# Altium PCB STM32H743I-EVAL2PCBDESIGN.PcbDoc (part 21 of 23)
Units mil, origin at the board's own origin, x right, y up, seen from the top; angles counter-clockwise.
Board outline 6558 x 5417 mil, 8 copper layers (L1_TOP, L2_GND, L3_HS1, L4_POWER, L5_SIG, L6_HS2, L7_GND, L8_BOTTOM), stack 61.368 mil thick; 620 components, 588 nets, 2945 pads, 1724 vias.
Unrouted connection lines stored in the file: 1.
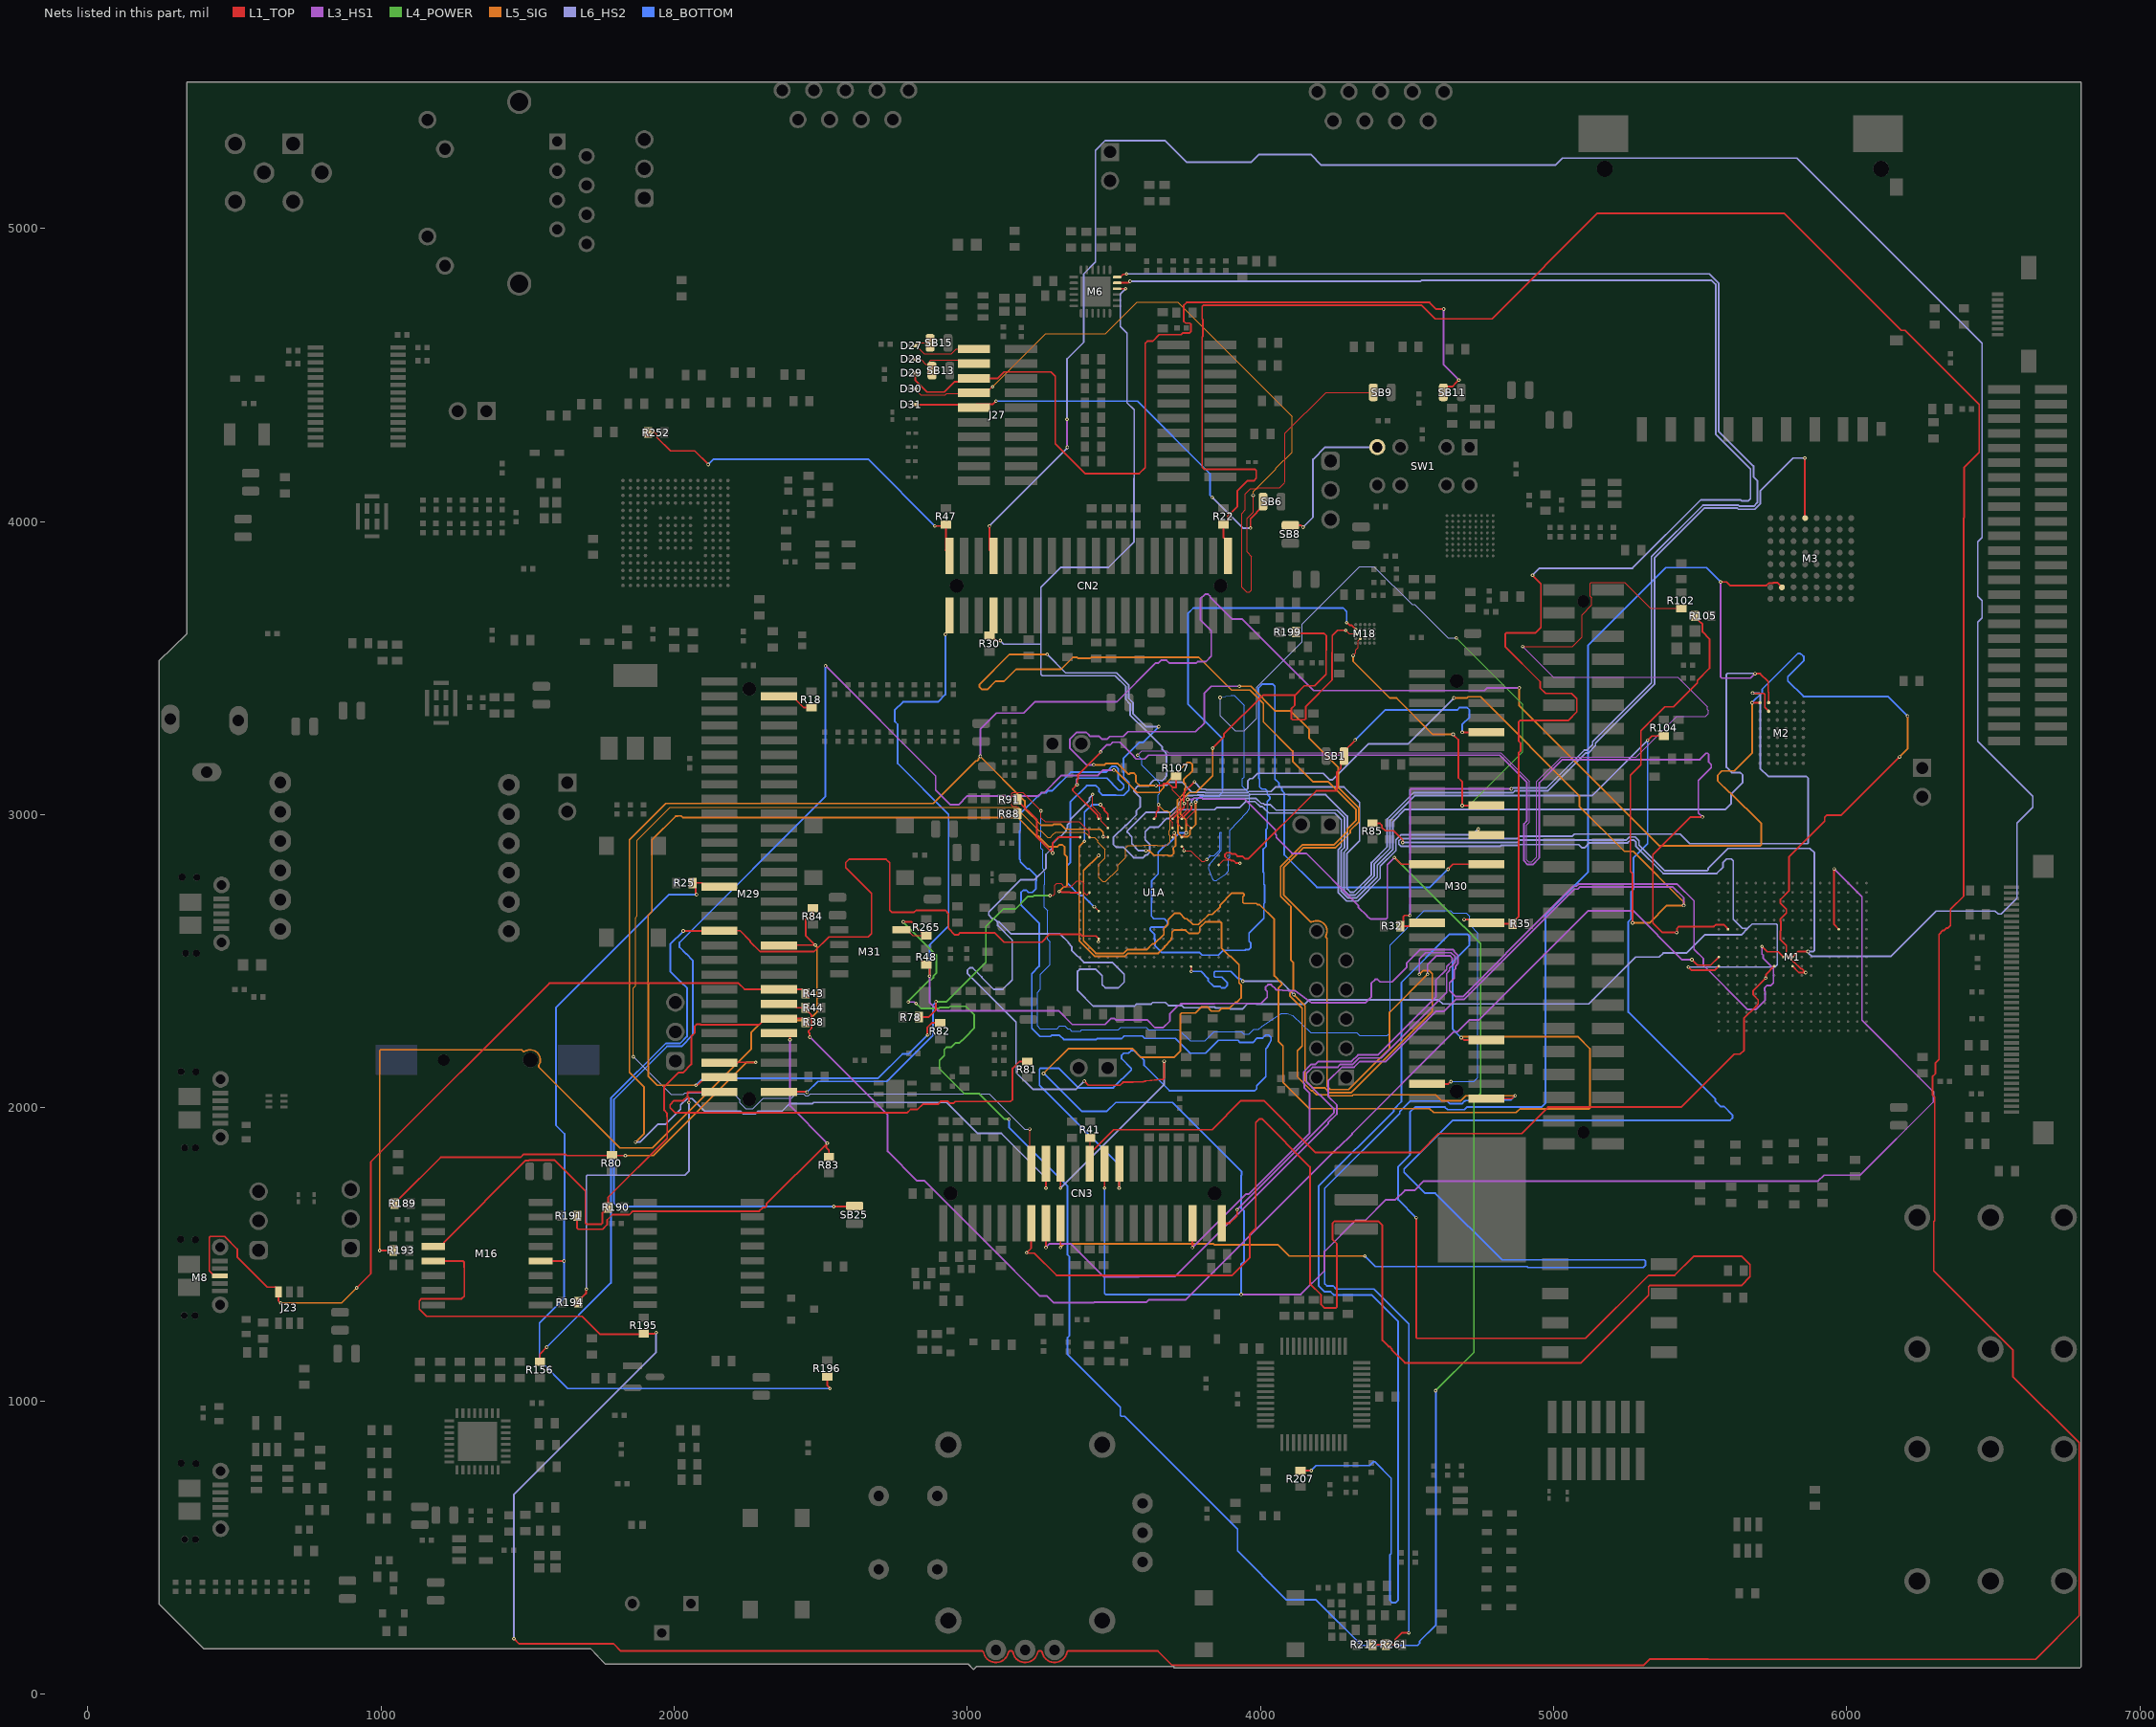
[diagram p18: the nets of this part, all layers, seen from the top]

## Via types
v1: diameter 12, hole 6, L1_TOP to L8_BOTTOM, tented both sides, 1724 vias

## Nets (pads, with @x,y where several pads share a name; then routed paths per layer and width w, separated by ;. In a path a pad name is that pad's centre, name@x,y a point inside that pad or via, vN(x,y) a via of type N, cw(c..) or ccw(c..) an arc to the next point about the centre after c; other vN are vias at no path point) (continued)
PC11: M18.B1 SB25.2 U1A.B13 | length 6565
  L1_TOP w4: U1A.B13@3763,2954.48 3748,2969.48 3748,2983.7 3779,3014.7 v1(3779,3043)
  L1_TOP w6: v1(2544,1663) 2613,1663 SB25.2@2615,1665 ; v1(4294,3655) 4295.62,3655 4304.77,3645.85 4311.9,3645.85 M18.B1@4325.01,3632.75
  L3_HS1 w6: v1(2516,3508) 2892,3132 2892,3084.33 2942.33,3034 2969.67,3034 2999.67,3064 3241.19,3064 3252.19,3075 3262.14,3075 3321.14,3134 3445.72,3134 3463.72,3152 v1(3500,3152)
  L5_SIG w6: v1(3500,3152) 3501.15,3150.85 3505.53,3150.85 3538,3118.38 3538,3117.33 3579.33,3076 3653.53,3076 3669.62,3092.09 3669.62,3098 3749.62,3178 3760.38,3178 3768,3170.38 3768,3149.19 3738,3119.19 3738,3111.87 3744,3105.87 3744,3090.13 3741.55,3087.68 3741.55,3075.07 3717,3050.53 3717,2994.26 3719,2992.26 3719,2936 3730.05,2924.95 3751.86,2924.95 3759.47,2932.57 3759.47,2946.71 3779,2966.24 v1(3779,3043)
  L8_BOTTOM w6: v1(2516,3508) 2516,3062 2018,2564 2018,2547.62 2040.31,2525.31 2040.69,2525.31 2063,2503 2063,2248 2024.5,2209.5 1975.28,2209.5 1794,2028.22 1794,1675.37 1806.37,1663 v1(2544,1663) ; v1(3779,3043) 3779,3044.62 3782,3047.62 3782,3049.38 3795.62,3063 3857.67,3063 3870,3075.33 3870,3259.86 3753.23,3376.63 3753.23,3687.37 3770.86,3705 4282.49,3705 4294,3693.49 v1(4294,3655)
PC12: M18.C1 M30.33 R199.2 U1A.C12 | length 4936.5
  L1_TOP w2: U1A.C12@3731.5,2922.98 v1(3746.47,2937.95) ; v1(4291,3629) 4303,3617 M18.C1@4325.01,3617
  L1_TOP w6: v1(3837,3227) 3874.88,3264.88 3874.88,3274.27 4008.17,3407.55 4117.17,3407.55 ; R199.2@4120.56,3623 4125.56,3618 4217.38,3618 4225,3610.38 4225,3599.62 4224.28,3598.9 4224.28,3561.52 4224.05,3561.29 4224.05,3479.66 4184.38,3440 4149.62,3440 4117.17,3407.55 ; v1(4291,3629) 4263.45,3629 4245,3610.55 4245,3553.95 4244.28,3553.24 4244.28,3459.14 4154.72,3369.57 4154.72,3337.88 4154.72,3327.88 4150.62,3323.78 4109.38,3323.78 4105.28,3327.88 4105.28,3361.77 4117.17,3373.66 4117.17,3407.55 ; v1(4640,2814) 4657,2831 M30.33@4770.99,2831
  L5_SIG w6: v1(3746.47,2937.95) 3746.47,2981.74 3727,3001.22 3727,3046.38 3756.44,3075.82 3780.56,3075.82 3837,3132.26 v1(3837,3227)
  L8_BOTTOM w6: v1(3746.47,2937.95) 3724.34,2937.95 3682.38,2896 3675.38,2896 3651,2871.62 3651,2797.38 3629,2775.38 3629,2699.73 3627.97,2698.7 3627.97,2653.81 3636.78,2645 3671.44,2645 3682.04,2634.4 3682.04,2623.63 3674.42,2616.02 3632.16,2616.02 3631.97,2616.2 3627,2616.2 3623.49,2612.69 3623.49,2606.88 3638.98,2591.38 3638.98,2575.54 3640,2574.53 3640,2553.62 3664,2529.62 3792.72,2529.62 3801.33,2521 3856.67,2521 3872.67,2537 3947.33,2537 3949.33,2539 3959.38,2539 3967,2546.62 3967,2561.62 3961,2567.62 3961,2595.39 4011.37,2645.76 4011.37,2695.99 4014,2698.62 4014,2759.7 4011.37,2762.33 4011.37,2802.01 4009,2804.38 4009,2881.69 4019,2891.69 4019,2949.47 4023,2953.47 4023,3044.67 4032.49,3054.16 4032.49,3059.13 4023,3068.62 4023,3080.31 4016.31,3087 4004.62,3087 3997,3094.62 3997,3112.51 3996.81,3112.7 3996.81,3121.18 3994.9,3123.09 3994.9,3411.57 3993,3413.47 3993,3432.53 4006.47,3446 4040.73,3446 4049.25,3437.49 4049.25,3121.56 4063,3107.81 4063,3098.57 4073,3088.57 4073,3082.27 4081,3074.27 4081,2863.16 4192.16,2752 4578,2752 v1(4640,2814)
PC13: M30.09 R207.2 U1A.E3 | length 7512.8
  L1_TOP w2: v1(3448,2861) v1(3448,2861) U1A.E3@3448.04,2859.99
  L1_TOP w6: R207.2@4136,761.56 4136.44,762 v1(4173,762) ; v1(4685,2239) 4686.62,2239 4694.62,2231 M30.09@4770.99,2231
  L5_SIG w6: v1(3448,2861) 3396,2809 3396,2569.19 3438.19,2527 3533.38,2527 3546.38,2540 3612.72,2540 3632.02,2559.3 3638.18,2559.3 3670.48,2591.61 3670.48,2612.07 3685,2626.59 3685,2641.38 3707.37,2663.75 3723.87,2663.75 3742.62,2645 3749.47,2645 3769.47,2625 3776,2625 3788.53,2625 3807.53,2644 3808.47,2644 3823.78,2659.3 3835.52,2659.3 3862.5,2686.28 3862.5,2691.88 3902.95,2732.33 3939.95,2732.33 3943.47,2728.82 3943.47,2723.85 3940,2720.38 3940,2701 3944,2697 3985.62,2697 3989.62,2693 3997,2693 4047,2643 4047,2449.96 4072.52,2424.44 4072.52,2419.47 4061,2407.95 4061,2227.33 4077,2211.33 4077,2086.14 4166.14,1997 4577.1,1997 4590.52,1983.57 4872.39,1983.57 4884.81,1996 5120.34,1996 5123.86,1999.51 5123.86,2201.57 5083.42,2242 4689.62,2242 4686.62,2239 v1(4685,2239)
  L8_BOTTOM w6: v1(4173,762) 4190,779 4372.14,779 4385,791.86 4389.97,791.86 4446,735.83 4446,478.62 4442,474.62 4442,318.62 4449.62,311 4460.38,311 4469.62,320.23 4469.62,1270.96 4379.07,1361.5 4249.93,1361.5 4239.43,1372 4218.33,1372 4199,1391.33 4199,1733.29 4455,1989.29 4455,1994.91 4481,2020.91 4481,2427.51 4645.49,2592 4705.38,2592 4713,2584.38 4713,2555 4656,2498 4656,2268 v1(4685,2239)
PC14: M30.04 R88.2 U1A.C2 | length 3888.7
  L1_TOP w4: R88.2@3170.56,3003 3170.56,3025.94 3168.22,3028.28 3155.29,3028.28 3151.78,3031.8 3151.78,3072.2 3155.29,3075.72 3188.28,3075.72 v1(3251,3013) 3251,2990 3265,2976 3382.3,2976 3416.54,2941.75 U1A.C2@3416.54,2922.98
  L1_TOP w6: M30.04@4568,2081 4640.38,2081 4648.38,2089 v1(4650,2089)
  L8_BOTTOM w4: v1(3251,3013) 3251,2885.09 3257,2879.09 3257,2816.87 3261,2812.87 3261,2807.01 3264,2804.01 3264,2762.11 3263,2761.11 3263,2683.97 3273.99,2672.99 3273.99,2574.04 3282,2566.03 3282,2488.04 3249,2455.04 3249,2404.11 3239,2394.11 3239,2279 3248,2270 3305.89,2270 3314.89,2279 3333.11,2279 3342.11,2270 3348.11,2270 3356.11,2262 3386.22,2262 3389.99,2265.76 3515.4,2265.76 3523.64,2274 3609.58,2274 3617.82,2265.76 3721.84,2265.76 3759.6,2228 3811.4,2228 3842.4,2259 3934.97,2259 3942.62,2251.34 3961.8,2251.34 3977.46,2267 3993.95,2267 4005.6,2277 4071.09,2322 4072.4,2322 4091.8,2322 4109.44,2314.45 4171.29,2257 4327.97,2257 4337.97,2247 4432,2247 4442,2257 4442,2443.67 4442,2544 4442,2554.73 4559.27,2672 4570,2672 4629.89,2672 4648.11,2672 4656.11,2664 4701.97,2664 4713,2652.97 4713,2625.4 4742,2596.4 4742,2102.34 4728.66,2089 v1(4650,2089)
PC15: R91.2 U1A.C1 | length 369.4
  L1_TOP w6: R91.2@3171.56,3052 3171.56,3048.06 3237.6,2982.03 3237.6,2922.4 v1(3291,2869) 3291,2904 3309.98,2922.98 U1A.C1@3385.05,2922.98
PD2: M18.D2 M30.41 U1A.D12 | length 4140.4
  L1_TOP w2: U1A.D12@3731.5,2891.49 3737.09,2885.91 3737.09,2878.91 v1(3739,2877) 3757.87,2877 3758.18,2877.3 3761.63,2877.3 3766.83,2872.1 3798.93,2840 3810,2840 v1(3817,2847) ; v1(4316,3543) 4325,3552 4325,3563 4333,3571 4333,3593.5 M18.D2@4340.76,3601.25
  L1_TOP w6: v1(4657,3274) 4675.13,3255.87 4675.13,3125.62 4688.13,3112.62 v1(4688.13,3031) M30.41@4770.99,3031
  L4_POWER w2: v1(4668.12,3603) 4894.85,3376.27 4894.85,3214.02 4711.83,3031 v1(4688.13,3031)
  L5_SIG w6: v1(4316,3543) 4316,3523.62 4441.38,3398.23 4464.19,3398.23 4588.43,3274 v1(4657,3274)
  L6_HS2 w2: v1(3862.5,3400) 3862.5,3336.94 3913.44,3286 3945,3286 3987,3328 3987,3435.01 4141.72,3589.73 4141.72,3650.28 4338.44,3847 4387,3847 4517,3717 4526.13,3717 4640.13,3603 v1(4668.12,3603)
  L8_BOTTOM w2: v1(3817,2847) 3829.66,2859.66 3841.22,2859.66 3862.11,2880.55 3862.11,2939.28 3863.28,2940.45 3864.94,2940.45 3866.11,2939.28 3866.11,2878.89 3824.42,2826.88 ccw(c3833,2820) 3822.73,2816.07 3835.73,2782.07 ccw(c3846,2786) 3852.35,2777.02 3880.61,2797 3891.12,2807.52 3891.12,2817.72 3891,2817.85 3891,2850.15 3895.78,2854.93 3895.78,2947.23 3954.01,3009.38 3962.01,3021.68 3962.01,3070.21 3955,3077.22 3955,3080.97 3938.81,3097.16 3938.81,3122.84 3944,3128.03 3944,3373.31 3909.8,3407.51 3898.2,3407.51 v1(3862.5,3400)
PD3: M30.34 M31.8 R265.1 U1A.B12 | length 8146.7
  L1_TOP w4: M31.8@2775.3,2607 2794,2607 2813.56,2587.44 2856.06,2587.44 R265.1@2860,2587.44 ; U1A.B12@3731.5,2954.48 3715.46,2970.52 3715.46,2982.46 3722.5,2989.5 3722.5,2989.7 3752,3019.2 3752,3051 v1(3751,3052)
  L1_TOP w6: v1(2781.32,2633.96) 2809.54,2633.96 R265.1@2856.06,2587.44 ; v1(4457,2854) 4480,2831 M30.34@4568,2831
  L3_HS1 w6: v1(2798.49,2361) 2818.38,2361 2823.38,2356 v1(2825,2356) ; v1(3751,3052) 3769.62,3052 3773.62,3056 3788.62,3056 3789.61,3057 3800.38,3057 3804.38,3053 3945.85,3053 4051,2947.85 4051,2933.1 4054,2930.1 4054,2921.61 4107.61,2868 4128.85,2868 4156.06,2868 4333.57,2690.49 4333.57,2684.17 4363.79,2653.94 4363.98,2653.76 4373.96,2645.4 4374.78,2644.89 4376.22,2644 4377.93,2644 4429.49,2644 4433,2647.51 4433,2830 v1(4457,2854)
  L4_POWER w6: v1(2781.32,2633.96) 2894,2521.29 2894,2459 2884,2449 2884,2443.62 2876.38,2436 2871,2436 2798.49,2363.49 2798.49,2358.51 v1@2799.14,2357.86 ; v1(2825,2356) 2842,2339 2902.53,2339 2905.53,2342 2937.67,2342 2941.67,2346 2994.73,2346 3023.51,2317.21 3023.51,2272.23 3008.91,2257.62 3008.91,2256.76 2981.33,2229.19 2980.24,2229.19 2972.76,2221.71 2959.71,2221.71 2944,2206 2928.62,2206 2921,2198.38 2921,2177.47 2905,2161.47 2905,2133.16 2990.51,2047.65 3040.73,2047.65 3127,1961.38 3141.62,1961.38 v1(3142,1961) ; v1(4457,2854) 4457,2853.62 4692.62,2618 4693.53,2618 4751,2560.53 4751,2049.22 4728,2026.22 4728,1165 v1(4597.76,1034.76)
  L8_BOTTOM w6: v1(3142,1961) 3142,1932.62 3341,1733.62 3341,1499.53 3348,1492.53 3348,1221.33 3341,1214.33 3341,1158.86 3522,977.86 3522,950.51 3525.51,947 3536.67,947 3922,561.67 3922,488 4089,321 4189.52,321 4345.52,165 4535.38,165 4543,172.62 4543,179.28 4598,234.28 4598,1034.53 v1(4597.76,1034.76)
PD4: CN3.28 M2.A2 M3.G2 U1A.A12 | length 13129.9
  L1_TOP w6: v1(3202,1505) 3203.15,1503.85 3228.43,1503.85 3304,1428.28 3903.24,1428.28 3963,1488.05 3963,1567.24 3983.82,1588.06 3983.82,1948.82 3997,1962 4005.28,1962 4168.95,1798.33 4168.95,1399 4206.72,1361.24 4206.72,1328.45 4217.94,1317.22 4257.49,1317.22 4261,1320.74 4261,1535.6 4245.43,1551.17 4245.43,1605.53 4252.38,1612.49 4401.68,1612.49 4416.03,1598.14 4416.03,1206.35 4437.38,1185 4440.38,1185 4448,1177.38 4448,1174.38 4492.9,1129.49 5093.81,1129.49 5323.96,1359.64 5323.96,1388.98 5328.06,1393.08 5640.03,1393.08 5670.34,1423.38 5670.34,1464.62 5641.88,1493.08 5477.98,1493.08 5412.86,1427.96 5323.96,1427.96 5109,1213 4534.51,1213 4531,1216.51 v1(4531,1625) ; v1@3203.43,1506.43 3218,1521 CN3.28@3218,1606 ; U1A.A12@3731.5,2985.98 3764,3018.47 v1(3764,3036) ; v1(5570,3794) 5589.69,3794 5601.69,3782 5726.31,3782 5734.09,3789.78 5748.46,3789.78 5750.68,3792 5763.04,3792 M3.G2@5779.26,3775.78 ; v1(5687,3481) 5705,3481 5732,3454 5732,3419.62 5733.89,3417.73 5733.89,3382.83 M2.A2@5733.53,3382.47
  L3_HS1 w6: v1(5570,3794) 5570,3469.51 5573.51,3466 5672,3466 v1(5687,3481)
  L6_HS2 w6: v1(3764,3036) 3765.15,3037.15 3765.15,3047.53 3773.62,3056 3788.62,3056 3789.62,3057 3800.38,3057 3802.38,3055 3985.62,3055 4002.62,3038 4010.14,3038 4014.14,3034 4034.62,3034 4053.28,3015.33 4261.29,3015.33 4286.22,2990.41 4286.22,2887.25 4275,2876.03 4275,2738.81 4298.43,2715.38 4326.81,2715.38 4398.38,2786.95 4398.38,2827.91 4452,2881.53 4452,2976.38 4493.62,3018 5586.49,3018 5606,3037.51 5606,3070.47 5645,3109.47 5645,3135.38 5636.38,3144 5607.38,3144 5589.62,3161.77 5589.62,3478.49 5593.13,3482 5686,3482 v1(5687,3481)
  L8_BOTTOM w6: v1(4531,1625) 4470,1686 4470,1798.81 4510,1838.81 4510,1984.72 4527.51,2002.24 4629.34,2002.24 4638,1993.57 4695.35,1993.57 4704.02,2002.24 4958.48,2002.24 4972.62,2016.38 4972.62,2659.62 5118,2805 5118,3577.86 5383.14,3843 5521,3843 v1(5570,3794)
PD5: CN3.26 R105.1 U1A.A11 | length 6743.6
  L1_TOP w6: v1(3268,1523) CN3.26@3268,1606 ; U1A.A11@3700.01,2985.98 3738.85,3024.82 3738.85,3036.85 v1(3740,3038) 3738.85,3039.15 3738.85,3045.76 3738,3046.62 3738,3075 v1(3775,3112) ; v1(5269.12,2630.79) 5269.12,2799.26 5262,2806.38 5262,3134 5298,3170 5298,3286.48 5379.29,3367.77 5409.25,3367.77 5490.54,3449.05 5490.54,3457.95 5532,3499.41 5532,3600 5508.09,3623.91 5508.09,3649.99 5503.27,3654.81 5502.19,3654.81 5482.93,3674.08 R105.1@5482.93,3678.02
  L3_HS1 w6: v1(3268,1523) 3281,1536 3352.86,1536 3466.86,1422 3583.44,1422 3586.44,1425 3709.86,1425 3923.86,1639 3925.38,1639 4231,1944.62 4231,1948.86 4260.57,1978.43 4260.57,2009.31 4231,2038.88 4231,2091.5 4277.5,2138 4318.92,2138 4338.92,2158 4427.47,2158 4598.75,2329.28 4626.92,2329.28 4667.64,2370 4695.81,2370 4847.64,2521.83 4847.64,2522.88 5070.76,2746 5082.29,2746 5089.29,2753 5407,2753 5444,2716 v1(5444,2690)
  L5_SIG w6: v1(4660,3398) 4704,3398 4708,3402 4750.38,3402 5088,3064.38 5088,3028.62 5241.67,2874.94 5271.67,2874.94 5444,2702.62 v1(5444,2690) 5386.17,2690 5326.95,2630.79 v1(5269.12,2630.79)
  L6_HS2 w6: v1(3775,3112) 3786.54,3100.46 3786.54,3098.08 3797.62,3087 3812.81,3087 3814.81,3085 3952.49,3085 3956.81,3089.32 3956.81,3115.38 3964.42,3123 3973,3123 3991,3141 4213.8,3141 4235.62,3119.19 4246.38,3119.19 4369.2,3242 4504,3242 v1(4660,3398)
PD6: CN3.06 M3.A4 R107.2 U1A.B11 | length 9354.4
  L1_TOP w4: U1A.B11@3700.01,2954.48 3700.01,2973.25 3691.01,2982.25 3691.01,2989.7 3728,3026.7 3728,3055.73 3700.01,3083.72 3700.01,3093
  L1_TOP w6: v1(3644,3099) 3662.82,3099 3669.82,3106 3687.01,3106 3700.01,3093 3712,3093 R107.2@3712,3131.44 ; v1(3768,1523) CN3.06@3768,1606 ; v1(5857,4217) 5857.5,4216.5 5857.5,4012.5 M3.A4@5857.87,4012.13
  L3_HS1 w6: v1(3431,3170) 3405.84,3170 3350,3225.84 3350,3258.16 3372.84,3281 3405.16,3281 3415.16,3271 3418.16,3268 3448.47,3268 3458.47,3258 3477.53,3258 3486.53,3267 3531.53,3267 3547.53,3283 3778.53,3283 3808.57,3313.04 3808.57,3414.95 3831.62,3438 v1(3928,3438) ; v1(3768,1523) 3950,1705 3958.86,1705 4168,1914.14 4168,2049 4150,2067 4150,2081.36 4147,2084.36 4147,2121.64 4173.36,2148 4187.5,2148 4197.5,2158 4310.64,2158 4332.64,2180 4400.53,2180 4598,2377.47 4598,2435.14 4635,2472.14 4635,2481.44 4654,2500.44 4654,2511.21 4646.38,2518.83 4601.3,2518.83 4570,2487.53 v1(4570,2455)
  L5_SIG w6: v1(3431,3170) 3468.58,3170 3473.58,3175 3512.33,3175 3548.49,3138.84 3553.46,3138.84 3556.62,3142 3567.38,3142 3575,3134.38 3575,3112.33 3588.33,3099 v1(3644,3099) ; v1(3928,3438) 3967.27,3438 4051.27,3354 4103.38,3354 4166,3291.38 4166,3260.62 4266,3160.62 4266,3091.54 4336,3021.54 4336,2976.31 4306.22,2946.53 4306.22,2937.75 4255.79,2887.33 4147.33,2887.33 4079,2819 4079,2726.36 4171.52,2633.84 4174.01,2633.84 ; 4174.04,2633.84 4180.64,2636.11 cw(c4192,2603) 4222.84,2586.45 4222.84,2585.01 4222.84,2582.52 4227,2578.36 4227,2073.62 4238.62,2062 4300.5,2062 4440.68,2202.18 4440.68,2325.68 v1(4570,2455)
  L6_HS2 w6: v1(3644,3099) 3645,3100 3679.81,3100 3690.81,3111 3731.62,3111 3765.62,3077 3808.67,3077 3810.67,3075 3956.63,3075 3960.63,3079 4036.34,3079 4051.34,3094 4285,3094 4338,3041 4338,2910.74 4295,2867.74 4295,2747.1 4306.72,2735.38 4318.53,2735.38 4378.38,2795.24 4378.38,2814.38 4378.38,2836.2 4432,2889.81 4432,2984.67 4522.33,3075 4861.38,3075 4867.38,3081 4979.62,3081 5108.62,3210 5117.81,3210 5143,3235.19 5143,3244.38 5344,3445.38 5344,3876.14 5513.86,4046 5626.95,4046 5630.61,4042.35 5686.87,4042.35 5705,4060.47 5705,4104.3 5817.7,4217 v1(5857,4217)
PD7: CN3.24 R104.1 U1A.C11 | length 8561.5
  L1_TOP w2: U1A.C11@3700.01,2922.98 3701.12,2924.1 3701.12,2930.41 3706,2935.29 v1(3706,2938)
  L1_TOP w6: v1(3318,1523) CN3.24@3318,1606 ; v1(5321,3254) 5335.46,3268.46 R104.1@5376.49,3268.46
  L5_SIG w6: v1(3318,1523) 3331,1536 3839.19,1536 3843.19,1532 4060.38,1532 4098.38,1494 v1(4356,1494) ; v1(3609,2877) 3621.62,2877 3636.62,2862 3683.62,2862 3685.62,2860 3696.38,2860 3704,2867.62 3704,2878.38 3702.38,2880 3702.38,2886 3710,2893.62 3710,2929.76 3709,2930.76 3709,2933.38 3706,2936.38 v1(3706,2938)
  L6_HS2 w6: v1(3609,2877) 3584.62,2877 3561.01,2900.6 3561.01,2924.37 3545.76,2939.63 3545.76,2944.6 3609.52,3008.36 3694.75,3008.36 3720.18,3033.8 3720.18,3039.57 3745.62,3065 3768.47,3065 3769.47,3066 3784.47,3066 3785.47,3067 3804.53,3067 3806.53,3065 3960.77,3065 3964.77,3069 4093.27,3069 4094.27,3068 4222.77,3068 4296.22,2994.55 4296.22,2883.1 4285,2871.89 4285,2742.95 4302.57,2725.38 4322.67,2725.38 4388.38,2791.1 4388.38,2810.24 4388.38,2832.05 4442,2885.67 4442,2980.53 4526.47,3065 5132,3065 v1(5321,3254)
  L8_BOTTOM w6: v1(4356,1494) 4392,1458 4910.04,1458 4913.04,1455 5306.38,1455 5314,1462.62 5314,1475.68 5308.68,1481 4823.86,1481 4596.36,1708.5 4561.5,1708.5 4490,1780 4490,1790.53 4656.47,1957 5602.38,1957 5610,1964.62 5610,1975.38 5581.07,2004.31 5569.3,2004.31 5552,2021.62 5552,2029.14 5255,2326.14 5255,2635.05 5264,2644.05 5264,2737 5272.12,2745.12 5272.12,2851.59 5321,2900.47 v1(5321,3254)
PDM_CLK1: SB8.2 SW1.4 | length 527.5
  L1_TOP w6: SB8.2@4102,3987 4139,3987 v1(4145,3981)
  L6_HS2 w6: v1(4145,3981) 4179.21,4015.21 4179.21,4212.29 4220.88,4253.96 SW1.4@4398.52,4253.96
PE0: CN3.25 M1.K9 M2.A1 U1A.C4 | length 10879.2
  L1_TOP w2: v1(3463,2925) 3464.01,2923.99 3478.53,2923.99 U1A.C4@3479.54,2922.98
  L1_TOP w6: v1(3268,1725.99) CN3.25@3268,1808.99 ; v1(5677,3382) 5677.06,3382.06 5704.31,3382.06 M2.A1@5704.36,3382.11 ; M1.K9@5815.49,2483.02 5837.51,2461 v1(5860,2461) 5846.41,2474.59 5842.91,2474.59 5821.05,2496.45 5819.41,2496.45 5793.99,2521.87 5793.99,2553.87 5774.24,2573.62 5774.24,2604.11 5775,2604.87 5775,2635.35 5773.99,2636.36 5773.99,2644.65 5793.99,2664.65 5793.99,2677.75 5773.99,2697.75 5773.99,2710.85 5802.97,2739.83 5802.97,2855.97 5924.52,2977.52 5924.52,2990.9 5932.13,2998.52 5981.52,2998.52 v1(6180,3197)
  L3_HS1 w6: v1(3044,3199) 3044,3291.27 3099.73,3347 3192,3347 3230,3385 3509.62,3385 3641.62,3517 3650.47,3517 3660.47,3527 3679.53,3527 3689.53,3517 3780.47,3517 3785.47,3522 3813.38,3522 3832,3540.62 3832,3628 3795,3665 3795,3736.38 3810.62,3752 3821.38,3752 3829,3744.38 3829,3741.25 3903.25,3667 3938.43,3667 4181.85,3423.57 4764.1,3423.57 4773.35,3432.82 v1(4883,3432.82)
  L5_SIG w6: v1(1868,1883) 1897,1912 1897,2070.23 1847,2120.23 1847,2914 1971,3038 2883,3038 3028.64,3183.64 3033.9,3183.64 3037.42,3187.16 3037.42,3190.79 3044,3197.38 v1(3044,3199) 3196,3047 3196,3019.72 3251.72,2964 3290.76,2964 3293.76,2967 3319.38,2967 3336.38,2950 3453.15,2950 3463,2940.15 v1(3463,2925) ; v1(4883,3432.82) 4883,3371 5360,2894 5705.49,2894 5709,2897.51 5709,2969 5602,3076 5599.47,3076 5560,3115.47 5560,3134.53 5574.47,3149 5616.53,3149 5677,3209.47 v1(5677,3382) ; v1(6180,3197) 6207.56,3224.56 v1(6207.56,3336.44)
  L6_HS2 w6: v1(1868,1883) 1883.62,1883 1944.62,1944 1970.53,1944 2022,1995.47 2022,2009.62 2035.38,2023 2036.62,2023 2044.62,2031 2061,2031 2103.43,1988.57 2225.11,1988.57 2235.11,1978.57 2276.89,1978.57 2286.89,1988.57 2368.58,1988.57 2394.01,2014 2471.62,2014 2475.62,2018 2929,2018 3034.81,1912.19 3116.19,1912.19 3268,1760.38 v1(3268,1725.99)
  L8_BOTTOM w6: v1(5677,3382) 5711.81,3416.81 5711.81,3428.34 5833.47,3550 5841,3550 5843.59,3547.41 5845.64,3547.41 5853.26,3539.79 5853.26,3525.33 5799,3471.07 5799,3456.62 5852.24,3403.37 6140.63,3403.37 v1(6207.56,3336.44)
PE1: CN3.23 M1.K1 M2.B2 U1A.B4 | length 10542
  L1_TOP w4: v1(3427,3069) 3427,3027.85 3453.54,3001.3 3453.54,2993.2 3457.04,2989.7 3457.04,2982.25 3456.06,2981.27 3456.06,2977.96 U1A.B4@3479.54,2954.48
  L1_TOP w6: v1(3318,1725.99) CN3.23@3318,1808.99 ; v1(3399,2091) 3413,2077 3521.03,2077 3531.03,2087 3566.14,2087 3579.02,2088.27 ; 3579.05,2088.27 cw(c3579.61,2082.3) 3581.47,2088 3600.53,2088 3602.53,2090 3603.8,2090 ccw(c3603.8,2096) 3605.52,2090.25 3608.13,2091.03 cw(c3609.85,2085.28) 3609.26,2091.25 3667.49,2097 3669.08,2098.59 3669.24,2098.75 3671,2100.51 v1(3671,2158.67) ; v1(5460,2480) 5471,2469 5549.5,2469 M1.K1@5563.52,2483.02 ; v1(5679,3415) 5680.15,3413.85 5717.13,3413.85 5720.64,3410.34 5720.64,3365.83 M2.B2@5733.89,3352.58
  L6_HS2 w6: 3102.76,2635 3107.14,2635 3149.14,2593 3316.05,2593 3345,2564.05 3345,2561.38 3356,2550.38 3356,2537.29 3397.29,2496 3494.72,2496 3535,2455.72 3535,2428.62 3515.38,2409 3470.62,2409 3460,2419.62 3460,2450.38 3438.24,2472.14 3382.62,2472.14 3376,2465.53 3376,2400.33 3429.33,2347 3570.14,2347 3576.14,2353 3626.05,2353 3632.05,2359 3675.95,2359 3685.95,2349 3731.28,2349 3739.28,2341 3796.47,2341 3799.47,2344 3843.07,2344 3847.07,2340 3893.53,2340 3896.53,2337 3938.33,2337 3956.33,2355 3985.53,2355 3987.53,2353 4150.08,2353 4165.08,2368 4607.55,2368 4621.55,2354 5120.14,2354 5280.14,2514 5360.33,2514 5374.33,2528 5453.62,2528 5515.62,2590 5640.47,2590 5662.47,2612 ; v1(3318,1725.99) 3671,2078.99 v1(3671,2158.67) ; v1(3399,2091) 3371,2063 3223,2063 3166,2120 3166,2292.62 3000,2458.62 3000,2469.38 3007.62,2477 3018.38,2477 3049.43,2445.96 3049.43,2444.04 3089.47,2404 3120.67,2404 3153,2436.33 3153,2572.17 3103.63,2621.54 3103.63,2632.76 3102.07,2634.31 3090.88,2645.5 3085.12,2645.5 3073,2657.62 3073,2668.38 3182.62,2778 3229.95,2778 3268,2816.05 3268,2864.38 3290,2886.39 3290,2900.33 3314.51,2924.85 3317.37,2924.85 3337,2944.47 3337,2951.43 3342,2956.43 3342,2966.57 3352,2976.57 3352,2984.43 3417.06,3049.49 3417.06,3057.73 3427,3067.67 v1(3427,3069) ; v1(5460,2480) 5754.49,2480 5763,2488.51 5763,2623.49 5759.49,2627 5677.47,2627 5662.47,2612 ; v1(5679,3415) 5701.49,3415 5705,3411.49 5705,3158 5732,3131 5861.99,3131 5869,3123.99 5869,2904.67 5865.49,2901.15 5464.56,2901.15 5432.01,2933.7 5070.62,2933.7 5062.91,2926 4882.6,2926 4874.6,2918 4479.62,2918 4472,2910.38 4472,2899.62 4479.62,2892 4817.86,2892 4820.86,2895 4879.89,2895 4882.59,2897.7 5085.47,2897.7 5095.47,2887.7 5106.24,2887.7 5122.24,2903.7 5252.8,2903.7 5262.8,2913.7 5273.57,2913.7 5281.18,2906.09 5281.18,2891.94 5374.12,2799 5556.38,2799 5578,2820.62 5578,2836.89 5590.11,2849 5606.38,2849 5613,2842.38 5613,2642.62 5643.62,2612 5662.47,2612
PE2: D31.1 J27.12 SB6.2 | length 1487.7
  L1_TOP w6: D31.1@2821.61,4399 3012.88,4399 J27.12@3022.88,4389 3034.45,4400.57 3087.57,4400.57 v1(3098,4411) ; v1(3966,3978) 3966,4010 4009,4053 SB6.2@4009,4068
  L6_HS2 w6: v1(3835,4083) 3940,3978 v1(3966,3978)
  L8_BOTTOM w6: v1(3098,4411) 3580.27,4411 3828,4163.27 3828,4090 v1(3835,4083)
PE3: D30.1 J27.14 SB9.2 | length 3293.2
  L1_TOP w4: D30.1@2821.61,4453 2841.61,4433 2925.18,4433 2929.18,4437 J27.14@3020.88,4437 ; J27.14@3022.88,4439 3063.24,4439 3084.24,4460 v1(3086,4460) ; v1(3975,4090) 3975,4031.73 3954,4010.73 3954,3896.38 3970,3880.38 3970,3766.03 3962.97,3759 3953.03,3759 3936,3776.03 3936,4027.98 3948.31,4040.29 3948.31,4094.42 3965.89,4112 3989.77,4112 3992.77,4115 4065.87,4115 4082,4131.13 4082,4132.54 4084,4134.54 4084,4301 4224,4441 SB9.2@4385,4441
  L5_SIG w4: v1(3086,4460) 3268,4642 3472,4642 3579,4749 3717.09,4749 4108,4358.09 4108,4237 4053,4182 4053,4179.89 3975.11,4102 3975.11,4090.11 v1(3975,4090)
PE4: D29.1 J27.16 SB11.2 | length 3086.5
  L1_TOP w6: D29.1@2822.61,4507 2822.61,4481.39 2862,4442 2921.46,4442 2956.89,4477.43 3011.31,4477.43 J27.16@3022.88,4489 3103.73,4489 3125.3,4510.57 3285.82,4510.57 3300,4496.38 3300,4265.05 3401.05,4164 3586.49,4164 3606.88,4184.4 3606.88,4608.38 3614.5,4616 3632.76,4616 3654.76,4638 3729,4638 3734.4,4643.4 3757.65,4643.4 3763.05,4648.8 3763.05,4673.2 3758.95,4677.3 3744.81,4677.3 3737.78,4684.33 3737.78,4737.76 3748.02,4748 4577,4748 4600,4725 v1(4625,4725) ; SB11.2@4624,4441 4624,4448.84 4635.66,4460.5 4654.5,4460.5 4663,4469 4663,4469.51 4676.49,4483 v1(4677,4483)
  L3_HS1 w6: v1(4625,4725) 4625,4535 v1(4677,4483)
PE5: D28.1 J27.18 SB13.2 | length 271.5
  L1_TOP w4: D28.1@2822.61,4554 2840.5,4554 2858,4536.5 2866.42,4536.5 2879,4523.92 SB13.2@2879,4515 2872,4522 2872,4547.9 2876.1,4552 2969.53,4552 2982.53,4539 J27.18@3022.88,4539
PE6: D27.1 J27.20 SB15.2 | length 270.2
  L1_TOP w4: D27.1@2822.61,4600 D27.1@2825.07,4600 ; SB15.2@2873,4610 2835.07,4610 D27.1@2825.07,4600 ; J27.20@3022.88,4589 2962,4589 2955,4582 2955,4581.91 2946.09,4573 2852.07,4573 D27.1@2825.07,4600
PF6: M29.08 R80.2 R189.1 | length 1560.3
  L1_TOP w6: R189.1@1045.44,1673 1045.44,1676.94 1056.22,1687.72 1060.16,1687.72 1203.56,1831.12 1476.33,1831.12 1486.21,1841 1629.14,1841 1633.14,1837 v1(1833,1837) ; M29.08@2155.5,2155 v1(2278.01,2155)
  L5_SIG w6: v1(1833,1837) 1929,1837 2245.85,2153.85 2276.86,2153.85 v1(2278.01,2155)
PF7: M29.04 R81.2 R194.2 | length 2626.6
  L1_TOP w6: R194.2@1672.56,1336 1672.56,1339.94 1698.85,1366.23 1698.85,1379.85 v1(1700,1381) ; v1(2050,2018) 2050,2034.02 2046.5,2037.53 ; M29.04@2153.5,2053 2047.85,2053 2045.14,2053 2045.14,2038.88 2046.5,2037.53 ; R81.2@3204,2157.56 3177.28,2157.56 3154.01,2134.29 3154.01,2027.87 3147.15,2021 3135.62,2021 2958.47,2021 2952.47,2015 2940.62,2015 2933.62,2022 2909.47,2022 2899.47,2012 2847.6,2012 2829.93,1994.33 2806.19,1994.33 2794.86,1983 2002.61,1983 1986,1999.62 1986,2010.38 1999.57,2023.95 2030.22,2023.95 2043.79,2037.53 2046.5,2037.53
  L6_HS2 w6: v1(1700,1381) 1700,1766.49 1703.51,1770 2036.49,1770 2050,1783.51 v1(2050,2018)
PF8: M29.11 R83.2 R191.2 | length 1543
  L1_TOP w6: R191.2@1668.56,1631 1668.56,1589.18 1672.07,1585.66 1755.52,1585.66 1771.12,1601.26 1771.12,1617.2 1789.2,1635.28 1846.7,1635.28 1858.23,1646.81 2289.81,1646.81 2302.19,1659.19 2309.77,1659.19 2314.43,1663.84 2314.43,1671.43 2516.24,1873.24 2521.19,1878.19 v1(2522,1879) 2522,1877.38 2518.36,1873.74 2518.36,1863.98 2528,1854.34 R83.2@2528,1831.56 ; M29.11@2358.5,2255 2383,2255 2395,2243 v1(2395,2232)
  L3_HS1 w6: v1(2395,2232) 2395,2006 v1(2522,1879)
PF9: M29.23 R84.2 R193.1 | length 3122.3
  L1_TOP w6: v1(995,1513) R193.1@1041.44,1513 ; M29.23@2358.5,2555 v1(2481,2555) 2448.28,2587.72 2448.28,2642.12 2456.11,2649.95 2465.17,2649.95 2473,2657.78 R84.2@2473,2680.56
  L5_SIG w6: v1(995,1513) 995,2194.08 998.51,2197.59 1479.41,2197.59 1485.24,2191.76 1487.73,2191.76 1495.41,2194.94 cw(c1508.69,2163) 1537.45,2143.78 1537.45,2142.04 1537.45,2139.55 1814,1863 1925.38,1863 2262,2199.62 2262,2256.14 2303.86,2298 2458.43,2298 2487,2326.57 2487,2548.49 2481,2554.49 v1(2481,2555)
PF10: M30.01 R212.2 R261.1 U1A.L3 | length 8060.4
  L1_TOP w2: v1(3433.07,2685.98) U1A.L3@3448.04,2671.02
  L1_TOP w6: R212.2@4382.56,168 R261.1@4428.44,168 4451.22,168 4459.05,175.83 4459.05,184.89 4482.16,208 v1(4506,208) ; M30.01@4770.99,2031 4857.79,2031 4867.79,2041 v1(4869,2041)
  L5_SIG w6: v1(3272,3547) 3143.97,3547 3040.72,3443.75 3040.72,3436.29 3049.99,3427.02 3068.1,3427.02 3096.44,3455.36 3125.37,3455.36 3166.19,3496.18 3318.81,3496.18 3359.63,3537 3373.88,3537 3376.88,3534 3419.12,3534 3422.12,3537 3789.53,3537 3901.53,3425 3964.43,3425 4010,3379.43 4010,3316.53 4110,3216.53 4110,3181.62 4178.62,3113 4230.4,3113 4326,3017.4 4326,2980.45 4296.22,2950.67 4296.22,2941.89 4251.65,2897.33 4143.18,2897.33 4069,2823.14 4069,2722.22 4094.44,2695.99 4104,2686.44 4104,2502.62 4112.52,2494.1 4112.52,2402.9 4101,2391.38 4101,2380.62 4142,2339.62 4142,2210.38 4126,2194.38 4126,2105.36 4173.36,2058 4177,2058 4191,2044 4228.33,2044 4231.33,2041 4313.14,2041 4316.14,2044 4598,2044 4618.43,2023.57 4682.93,2023.57 4700.35,2041 v1(4869,2041)
  L6_HS2 w6: v1(3272,3547) 3335,3484 3508.83,3484 3550.76,3442.07 3550.76,3396.51 3565,3382.27 3565,3344.62 3609.62,3300 v1(3653,3300)
  L8_BOTTOM w6: v1(3433.07,2685.98) 3432.04,2685.98 3393.53,2724.5 3382.36,2724.5 3340,2766.86 3340,2825.5 3351,2836.5 3351,3042.81 3407.32,3099.13 3438.25,3099.13 3449.44,3087.95 3449.44,3078.18 3460.62,3067 3506.16,3067 3507.36,3065.8 3533.04,3065.8 3551.2,3083.96 3551.2,3109.64 3533.2,3127.64 3533.2,3142.3 3533,3142.5 3533,3193.38 3585.73,3246.12 3599.12,3246.12 v1(3653,3300) ; v1(4506,208) 4506,1262.86 4387.36,1381.5 4258.22,1381.5 4247.72,1392 4226.62,1392 4219,1399.62 4219,1725.01 4475,1981.01 4475,1986.63 4511.37,2023 4636.86,2023 4646.28,2013.57 4687.07,2013.57 4695.99,2022.5 cw(c4700.23,2018.25) 4699.42,2024.19 cw(c4700.27,2018.25) 4700.05,2024.25 ; 4700.1,2024.25 4778.19,2026 4778.29,2026 4778.36,2026 4854,2026 v1(4869,2041)
PF11: CN2.08 M1.J9 R85.2 | length 9776.9
  L1_TOP w6: 3075,3901.5 v1(3075,3984.5) ; R85.2@4382,2970.56 4407.44,2970.56 4413.91,2964.09 4413.91,2957.25 4425.98,2945.19 4453.65,2945.19 4485,2913.84 v1(4485,2905) ; M1.J9@5815.49,2514.52 5833.97,2533 v1(5868,2533)
  L3_HS1 w6: v1(3340,4349) 3340,4254.75 v1(3341,4253.75)
  L6_HS2 w6: v1(3075,3984.5) 3341,4250.5 v1@3341,4257 ; v1(3340,4349) 3340,4555.47 3397,4612.47 3397,4845.47 3437,4885.47 3437,5266.7 3470.51,5300.22 3673.94,5300.22 3748.15,5226 3968.14,5226 3995.14,5253 4170.94,5253 4207.44,5216.5 5006.4,5216.5 5030.46,5240.56 5829.42,5240.56 6462,4607.98 6462,3945.62 6447,3930.62 6447,3745.62 6462,3730.62 6462,3671.38 6447,3656.38 6447,3250.62 6635,3062.62 6635,3024.95 6581.19,2971.14 6581.19,2714.75 6527.38,2660.94 6516.62,2660.94 6506.62,2670.94 6304.94,2670.94 6151,2517 5880.37,2517 5871,2526.37 5871,2528.38 5868,2531.38 v1(5868,2533) 5886.49,2533 5890,2536.51 5890,2869.53 5874.53,2885 5594.62,2885 5527.5,2817.88 5527.5,2812.51 5523.99,2809 5378.27,2809 5291.18,2896.09 5291.18,2910.23 5277.71,2923.7 5258.65,2923.7 5248.65,2913.7 4884.45,2913.7 4875.74,2905 v1(4485,2905)
PG6: M29.57 R18.1 | length 186.6
  L1_TOP w6: M29.57@2298.98,3394 2356.5,3403 2406.02,3403 2416.01,3393 2416.01,3390.71 2441.28,3365.44 R18.1@2468,3365.44
PG7: M30.51 SB1.2 U1A.F16 | length 1400.3
  L1_TOP w4: U1A.F16@3857.49,2828.5 3874.49,2845.5 3888.34,2845.5
  L1_TOP w6: 3908,2843 3899.94,2843 3896.44,2846.5 3888.34,2846.5 3878.98,2855.85 3878.98,2864.13 3884.84,2869.99 3896.92,2869.99 3900.42,2866.5 3913.06,2866.5 3921.56,2857.99 3938.53,2857.99 3942.53,2854 3942.62,2854 3946.62,2850 3959.38,2850 4190.38,3081 4257.49,3081 4261,3084.51 4261,3145.33 4274.56,3158.89 4274.56,3174.56 4285,3185 4285,3216 4323,3254 v1(4323,3255) ; 3908.27,2843 3916.12,2835.15 3928.85,2835.15 v1(3930,2834) ; v1(4688.13,3281) M30.51@4770.99,3281
  L8_BOTTOM w6: v1(4323,3255) 4425,3357 4670.38,3357 4678.38,3365 4705.38,3365 4713,3357.38 4713,3332.44 4688.13,3307.57 v1(4688.13,3281)
PG8: CN2.40 M16.5 R22.1 R195.1 | length 16670
  L1_TOP w6: M16.5@1177.73,1477 1279.49,1477 1283,1473.49 1283,1455.63 1284,1454.63 1284,1357.56 1274.63,1348.19 1137.61,1348.19 1130.57,1341.16 1130.57,1312.84 1155.23,1288.19 1685.77,1288.19 1746.95,1227 1894,1227 R195.1@1896,1229 1932.38,1229 1936.38,1233 v1(1938,1233) ; v1(1453,188) 1470,171 1793,171 1818,146 3052.02,146 3053.77,144.24 3055.08,142.93 ccw(c3097.5,150) 3137.85,135.13 3141.2,144.21 ; 3141.23,144.24 3142.98,146 3152.02,146 3153.77,144.24 3155.08,142.93 ccw(c3197.5,150) 3237.85,135.13 3241.2,144.21 ; 3241.23,144.24 3242.98,146 3252.02,146 3253.77,144.24 3255.08,142.93 ccw(c3297.5,150) 3337.85,135.13 3341.2,144.21 ; 3341.23,144.24 3342.98,146 3650,146 3699,97 5306.14,97 5327.66,118.51 5527.49,118.51 5528,118 6644,118 6793.29,267.29 6793.29,856.66 6566.65,1083.31 6566.65,1174.31 6296.96,1443.99 6296.96,1611.96 6300,1615 6300,2036.54 6292.78,2043.75 6292.78,2106.34 6303.2,2116.76 6303.2,2153.06 6315,2164.86 6315,2591.53 6328.47,2605 6332.38,2605 6340.81,2613.43 6345.57,2613.43 6354,2621.86 6354,2676.86 6399,2721.86 6399,4013 6401,4015 6401,4185.08 6442.05,4226.12 6442.05,4226.91 6452.05,4236.91 6452.05,4400.34 6199.5,4652.89 6185.36,4652.89 5786.25,5052 5149.58,5052 4789.58,4692 4595.86,4692 4549.86,4738 3804.71,4738 3801.2,4734.49 3801.2,4691.62 3803.05,4689.77 3803.05,4632.23 3801.2,4630.38 3801.2,4185.53 3808.73,4178 3981.7,4178 3985.67,4174.03 3985.67,4147.62 3977.06,4139 3954.7,4139 3921.31,4105.6 3921.31,4051.47 3888.72,4018.88 3888.72,4001.22 3877.94,3990.44 R22.1@3874,3990.44 3874,3945.52 3889,3930.52 CN2.40@3889,3883
  L6_HS2 w6: v1(1453,188) 1453,680.38 1938,1165.38 v1(1938,1233)
PG9: M16.12 M29.32 R25.1 R196.2 | length 3188
  L1_TOP w6: M16.12@1544.27,1477 v1(1624,1477) ; v1(2076,2727) 2076,2728.62 2073.34,2731.28 2073.34,2756.22 R25.1@2062.56,2767 2093.98,2767 2106.98,2754 M29.32@2154.5,2754 ; R196.2@2522,1082.44 2522,1052.62 2531,1043.62 v1(2531,1042)
  L8_BOTTOM w6: v1(2076,2727) 1981.62,2727 1596.18,2341.57 1596.18,1940.45 1626,1910.63 1626,1634 1624,1632 v1(1624,1477) 1624,1349.19 1540,1265.19 1540,1139 1637,1042 v1(2531,1042)
PG10: CN3.27 R102.1 U1A.A9 | length 9091.6
  L1_TOP w4: v1(3213,1927) 3213,1813.99 CN3.27@3218,1808.99 ; v1(4895,3574) 5064.62,3574 5097.38,3606.76 5097.38,3682.15 5130.15,3714.91 5130.15,3740.03 5125.32,3744.86 5125.32,3788.83 5128.84,3792.34 5241.81,3792.34 5330.69,3703.46 R102.1@5435.49,3703.46
  L1_TOP w6: U1A.A9@3637.02,2985.98 3637.02,2986.75 3644.51,2994.25 3644.51,3008.49 3652,3015.98 v1(3652,3034)
  L3_HS1 w4: v1(3581,3203) 3595,3217 3680.03,3217 3685.03,3212 4819.68,3212 4918,3113.68 4918,2975.09 4908,2965.09 4908,2846.03 4915.03,2839 4924.97,2839 4942,2856.03 4942,3112.68 5026.32,3197 5280.97,3197 5419.97,3336 5518.97,3336 5528,3345.03 5528,3355.51 5525.34,3358.17 5525.34,3368.66 5424.27,3469.73 4999.27,3469.73 v1(4895,3574)
  L5_SIG w4: v1(1860,2174) 1860,2408.08 1868,2416.08 1868,2648 1874,2654 1874,2912.73 1986.27,3025 3174.66,3025 3177,3022.66 3177,3011.85 3243.85,2945 3251.03,2945 3273.03,2923 3282.97,2923 3291.48,2931.51 3300.97,2941 3399.14,2941 3408.63,2931.51 3417.26,2922.89 3433.61,2922.89 3445.07,2911.43 3445.07,2905.96 3470,2881.03 3470,2851.89 3449,2830.89 3449,2785.03 3462.03,2772 3471.97,2772 3513.74,2813.77 3513.74,2827.71 3539.56,2853.53 3539.56,2886.19 3547.36,2893.99 3597.8,2893.99 3599.82,2896 3646.46,2896 3648,2894.46 3658.51,2894.46 3659.06,2895 3679,2895 3691.72,2907.72 3691.72,2926.82 3688,2930.54 3688,2945.46 3691,2948.46 3691,3004.87 3681.7,3014.17 3669.83,3014.17 3652,3032 v1(3652,3034)
  L6_HS2 w4: v1(1860,2174) 1989,2045 2031.75,2045 2036.75,2050 2200.94,2050 2224.57,2026.37 2224.57,2015.98 2242.98,1997.57 2269.02,1997.57 2304.44,2033 2400.28,2033 2414.28,2047 2442.03,2047 2448.03,2041 2457.97,2041 2463.97,2047 3075,2047 3195,1927 v1(3213,1927)
  L8_BOTTOM w4: v1(3581,3203) 3595,3189 3595,3168.97 3656,3107.97 3656,3071.83 3651,3066.83 3651,3035 v1(3652,3034)
PG11: CN2.07 M6.16 M30.37 R30.1 | length 4718.5
  L1_TOP w6: R30.1@3076,3610.56 3079.94,3610.56 3097.64,3592.85 3110.85,3592.85 v1(3112,3594) ; M6.16@3510.84,4794.84 v1(3539.79,4794.84) ; v1(4743,2951) 4743,2942 4754,2931 M30.37@4770.99,2931
  L6_HS2 w6: v1(3112,3594) 3124,3582 3251.05,3582 ; v1(3539.79,4794.84) 3522,4777.06 3522,4666.22 3545,4643.22 3545,4405.33 3569,4381.33 3569,4147.95 3568,4146.95 3568,3930.14 3481.86,3844 3319.62,3844 3251.05,3775.43 3251.05,3582 ; v1(4743,2951) 4723,2931 4478.47,2931 4462,2914.53 4462,2877.38 4408.38,2823.77 4408.38,2782.81 4330.95,2705.38 4294.29,2705.38 4265,2734.67 4265,2880.17 4276.22,2891.39 4276.22,2982.49 4253.37,3005.33 4028.81,3005.33 4011.98,3022.17 4011.83,3022.17 4005.99,3028 3998.47,3028 3981.47,3045 3949.4,3045 3928.39,3023.99 3849.94,3023.99 3842.95,3017 3717.53,3017 3687.53,2987 3680.47,2987 3650.47,2957 3621.62,2957 3607,2942.38 3607,2914.5 3622,2899.5 3622,2871.62 3612.78,2862.39 3609.01,2862.39 3599.78,2853.17 3567.21,2853.17 3531.38,2888.99 3507.62,2888.99 3498,2898.62 3498,2922.39 3539.47,2963.86 3541,2963.86 3576.62,2999.47 3576.62,3013.09 3590,3026.47 3590,3057.53 3568.73,3078.8 3568.73,3083.77 3582.95,3098 3619,3098 3621.76,3100.76 3622.51,3101.51 3625.03,3106.27 3626.35,3108.22 3634.78,3116.65 3636.76,3118 3651.24,3118 3662.09,3116 3664.56,3116 3664.77,3116 3668.29,3119.52 3679.65,3133.23 3679.65,3200.44 3678,3209.13 3665,3222.13 3665,3231.1 3610.31,3285.78 3609.69,3285.78 3555,3340.47 3555,3378.13 3540.76,3392.37 3540.76,3437.93 3504.69,3474 3256.56,3474 3251.05,3479.51 3251.05,3582
PG12: M6.18 M30.26 R32.1 | length 5310.3
  L1_TOP w6: M6.18@3510.84,4834.21 3521.22,4834.21 3530.86,4843.85 3541.85,4843.85 v1(3543,4845) ; v1(4510,2656) 4491.62,2656 4487.34,2651.72 4487.34,2630.78 R32.1@4476.56,2620 4509.48,2620 4520.48,2631 M30.26@4568,2631
  L3_HS1 w6: v1(4510,2656) 4510,3084.49 4513.51,3088 v1(4856,3088)
  L6_HS2 w6: v1(3543,4845) 5531.86,4845 5563,4813.86 5563,4308.38 5682,4189.38 5682,4152.62 5695,4139.62 5695,4064.62 5682.73,4052.35 5634.75,4052.35 5631.1,4056 5509.72,4056 5334,3880.28 5334,3449.53 5133,3248.53 5133,3239.33 5113.67,3220 5104.47,3220 4975.47,3091 4860.62,3091 4857.62,3088 v1(4856,3088)
PG13: M6.17 M30.25 R35.1 | length 5512.4
  L1_TOP w6: M6.17@3510.84,4814.53 3547.9,4814.53 3553.38,4820 v1(3555,4820) ; v1(4695,2642) 4760,2642 4773.99,2628 R35.1@4860.44,2628 4860.44,2631.94 4881.22,2652.72 4881.22,3211.7 4886.85,3217.33 4886.85,3244.67 4881.22,3250.3 4881.22,3317.39 4884.74,3320.9 5049.16,3320.9 5079,3350.74 5079,3395.54 5060.67,3413.87 4972.61,3413.87 4954.27,3432.21 4954.27,3453.73 4834.9,3573.1 4834.9,3616.38 4838.41,3619.9 4937.86,3619.9 4957,3639.03 4957,3788 v1(4928,3817)
  L6_HS2 w6: v1(3555,4820) 4546.67,4820 4549.67,4823 5539.72,4823 5553,4809.72 5553,4298 5672,4179 5672,4078.38 5663.96,4070.35 5642.2,4070.35 5638.55,4074 5502.26,4074 5269.26,3841 4952,3841 v1(4928,3817)
PG14: M16.4 M29.13 R38.1 R190.1 | length 2072.9
  L1_TOP w6: M16.4@1177.73,1527 1206.08,1527 1214.89,1535.81 1214.89,1541.4 1493.49,1820 1503.69,1820 1504.69,1821 1592.38,1821 1697,1716.38 1697,1606.51 1700.51,1603 1751.65,1603 1755.17,1606.51 1755.17,1641.77 1758.68,1645.28 1763.66,1645.28 1774.44,1656.06 R190.1@1774.44,1660 ; R190.1@1774.44,1663.94 1774.44,1694.3 1976,1895.86 1976,1969.37 1975,1970.37 1975,1982.33 1966,1991.33 1966,2072.14 2013.36,2119.5 2029.58,2119.5 2058.08,2148 2058.08,2242.99 2070,2254.91 2070,2278.14 2076.86,2285 2088.09,2285 2090.09,2283 2288.98,2283 2309.98,2304 2436.66,2304 2447.44,2293.22 R38.1@2447.44,2292
PG15: CN3.19 M1.K7 R41.1 | length 2955.5
  L1_TOP w4: CN3.19@3419,1845.4 R41.1@3419,1897.44
  L1_TOP w6: CN3.19@3418,1808.99 3418,1844.4 3419,1845.4 3498.6,1925 3835,1925 3934,2024 4011.43,2024 4188.43,1847 4543.09,1847 4608.09,1912 4890.78,1912 4980.78,2002 5435.63,2002 5616.63,2183 5636.53,2183 5650,2196.47 5650,2215.53 5649.58,2215.95 5649.58,2305.19 5691,2346.61 5697.93,2353.55 5697.93,2368.19 5681.07,2385.04 5681.07,2399.68 5723.39,2442 v1(5724,2442) 5725.15,2443.15 5725.15,2455.68 5752.24,2482.77 M1.K7@5752.24,2483.01
PH0: M29.03 R78.2 U1A.J2 | length 1654.9
  L1_TOP w4: v1(3282,2724) 3283.53,2725.53 3293.53,2725.53 3298,2730 3298,2758.97 3305.03,2766 3318.72,2766 3329.72,2755 3353.28,2755 3372.8,2774.51 3388.77,2774.51 3397.23,2766.04 3397.23,2734.95 3405.7,2726.48 3409.02,2726.48 U1A.J2@3416.54,2734.01
  L1_TOP w6: M29.03@2358.5,2055 2449.38,2055 2451.38,2053 v1(2453,2053) ; R78.2@2834.56,2309 2867,2309 2893,2335 v1(2893,2362)
  L4_POWER w6: v1(2893,2362) 2929.38,2362 3063,2495.62 3063,2619.38 3121.81,2678.19 3163.58,2678.19 3206.38,2721 3224.62,2721 3227.62,2724 v1(3282,2724)
  L8_BOTTOM w6: v1(2453,2053) 2490,2090 2725.38,2090 2883,2247.62 2883,2350.79 2893,2360.79 v1(2893,2362)
PH1: M29.06 R82.2 U1A.J1 | length 3750.2
  L1_TOP w6: v1(2074,2077) 2075.15,2078.15 2081.13,2078.15 2105.98,2103 M29.06@2153.5,2103 ; v1(2864,2248) 2863.15,2248.85 2863.15,2272.15 2881,2290 2905.56,2290 R82.2@2907,2288.56 ; v1(3313,2738) 3314.15,2736.85 3320.99,2736.85 3322.85,2735 3350.45,2735 3351.44,2734.01 U1A.J1@3385.05,2734.01
  L5_SIG w6: v1(2074,2077) 1941.51,2077 1912,2106.51 1912,2424.12 1911,2425.12 1911,2656.38 1924,2669.38 1924,2914 2005,2995 2011.62,2995 2012.62,2996 2023.38,2996 2029.38,2990 3171.98,2990 3235.98,2926 3243.16,2926 3279.16,2890 3306.62,2890 3313.62,2897 3324.38,2897 3332,2889.38 3332,2864 3340,2856 3340,2758.62 3335.77,2754.38 3329.38,2754.38 v1(3313,2738)
  L8_BOTTOM w6: v1(2074,2077) 2097,2100 2695,2100 2778.43,2183.43 2799.43,2183.43 v1(2864,2248)
PH2: J23.3 M8.3 M29.17 R43.1 | length 3016.4
  L1_TOP w6: M8.3@449.61,1426 431.11,1426 420.66,1436.45 420.35,1436.45 414.09,1442.71 414.09,1557.41 417.61,1560.93 465.71,1560.93 509,1517.64 509,1490.86 611.86,1388 641.6,1388 649.6,1380 J23.3@649.6,1371.75 649.6,1341.4 v1(657,1334) ; v1(916.64,1385.45) 964.82,1433.63 964.82,1815.82 1574,2425 2218.92,2425 2239.92,2404 2436.66,2404 2447.44,2393.22 R43.1@2447.44,2390
  L5_SIG w6: v1(657,1334) 865.19,1334 v1(916.64,1385.45)
PH3: M1.J1 M29.15 R44.1 | length 4401.5
  L1_TOP w6: M29.15@2357.5,2354 2405.02,2354 2418.02,2341 R44.1@2447.44,2341 2447.44,2337.06 2468.22,2316.28 2468.22,2271.38 2458.85,2262.02 2458.85,2257.05 2461.85,2254.05 2461.85,2242.15 v1(2463,2241) ; v1(5472,2505) 5488.32,2488.68 ccw(c5493.62,2494.04) 5493.64,2486.5 5535.5,2486.5 M1.J1@5563.52,2514.52
  L3_HS1 w6: v1(2463,2241) 2728.14,1975.86 2728.14,1851.14 2828.58,1750.7 2853.58,1750.7 3161.38,1442.9 3161.38,1442.67 3246.05,1358 3271.05,1358 3294.05,1335 3431.1,1335 3432.1,1336 3610.57,1336 3619.57,1345 3745.33,1345 3816,1415.67 4264.33,1864 4266.14,1864 4313,1910.86 4313,1912.67 4659.61,2259.28 4672.75,2259.28 4713.47,2300 4746.38,2300 5118.38,2672 5271.38,2672 5438.38,2505 v1(5472,2505)
PH4: M29.26 R156.1 U1A.P3 | length 3874.7
  L1_TOP w6: R156.1@1542,1133.56 1542,1160 v1(1565,1183) ; v1(2031,2603) M29.26@2153.5,2603 ; M29.26@2154.5,2604 2225.02,2604 2259.05,2569.97 2259.05,2567.03 2293.08,2533 2477.39,2533 2527.39,2583 2662,2583 2672.88,2593.88 2672.88,2731.12 2585,2819 2585,2836.63 2596.37,2848 2722.63,2848 2735,2835.63 2735,2674.02 2742.02,2667 2818.5,2667 2824.84,2673.34 2925.66,2673.34 2931.28,2667.72 2931.28,2665.74 2936,2661.02 2936,2611.62 2957.62,2590 2968.38,2590 2975.38,2597 3093.18,2597 3125.18,2565 3253.62,2565 3280.62,2592 3386,2592 3392,2586 3438.52,2586 U1A.P3@3448.04,2576.53 ; v1(3447,2566) 3447.52,2566.52 3447.52,2576.01 U1A.P3@3448.04,2576.53
  L8_BOTTOM w6: v1(1565,1183) 1784,1402 1784,2032.37 1971.14,2219.5 2020.36,2219.5 2043.5,2242.64 2043.5,2397.11 2044,2397.62 2044,2408.38 2022.38,2430 2021.47,2430 1986.49,2464.99 1986.49,2558.49 v1(2031,2603)
PH5: CN2.02 R47.1 R252.1 | length 1260.8
  L1_TOP w6: R252.1@1910.44,4304 1933,4304 1940.94,4296.06 1940.94,4287.22 1987.05,4241.11 2069.89,4241.11 v1(2116,4195) ; v1(2889,3985) 2921.56,3985 R47.1@2927,3990.44 2927,3903.5 2925,3901.5
  L8_BOTTOM w6: v1(2116,4195) 2134,4213 2661,4213 v1(2889,3985)
PH6: CN2.01 M1.J8 R48.1 | length 5723.4
  L1_TOP w6: R48.1@2860,2487.44 2860.22,2487.44 2871,2476.66 v1(2871,2449) ; v1(2925,3615.5) 2926.15,3616.65 2926.15,3619.64 2928,3621.49 CN2.01@2928,3698.5 ; v1(5711,2550) 5729.04,2531.96 5766.55,2531.96 M1.J8@5783.99,2514.52
  L3_HS1 w6: v1(2871,2449) 2871,2359.43 2899.43,2331 3310.81,2331 3357.81,2284 3469.62,2284 3486.62,2301 3490.62,2305 3501.38,2305 3505.38,2301 3506.38,2300 3613.33,2300 3640.33,2273 3667.67,2273 3691,2296.33 3691,2321.38 3719.04,2349.43 3723.29,2349.43 3728.86,2355 3843.72,2355 3844.72,2356 4001.53,2356 4023,2377.47 4023,2396.53 4017,2402.53 4017,2411.09 4025.76,2419.85 4036.53,2419.85 4052.03,2404.35 4053.57,2402.81 4055.75,2402.62 4095.11,2399.17 4095.78,2398.85 4106.46,2398.85 4108.62,2399 4119.38,2399 4174.86,2358 4175.85,2358 4358.38,2358 4366.14,2365.76 4366.14,2366.49 4369.66,2370 4370.38,2370 4378,2377.62 4378,2424.53 4391.47,2438 4399.29,2438 4407.98,2429.31 4449.4,2429.31 4498.76,2478.67 4498.76,2492.81 4545.95,2540 4657,2540 4661,2536 4661,2532.5 4674,2519.5 4674,2492.16 4669,2487.16 4669,2485.86 4665,2481.86 4665,2473.86 4661,2469.86 4661,2442.67 4645,2426.67 4645,2399.33 4664.33,2380 4691.67,2380 4837.64,2525.97 4837.64,2527.02 5066.62,2756 5078.15,2756 5085.15,2763 5422,2763 5479,2706 5479,2540.62 5511,2508.62 5511,2486.33 5662.33,2335 5689.67,2335 5722,2367.33 5722,2396.62 5720,2398.62 5720,2409.38 5728.12,2417.5 5741.88,2417.5 5750,2425.62 5750,2474.65 5715.26,2509.39 5715.26,2520.16 5711,2524.42 v1(5711,2550)
  L8_BOTTOM w6: v1(2871,2449) 2871,2555.62 2936,2620.62 2936,3000.68 2762,3174.68 2762,3308.33 2752,3318.33 2752,3356.67 2780.33,3385 2900.25,3385 2925,3409.75 v1(2925,3615.5)
PH7: CN3.02 U1A.U13 | length 3251.8
  L1_TOP w6: U1A.U13@3763,2482.04 3763.5,2481.54 3763.5,2465.5 v1(3764,2465) ; CN3.02@3868,1606 3895,1606 3920,1631 v1(3920,1652)
  L3_HS1 w6: v1(3920,1652) 4250.57,1982.57 4250.57,1997.15 4204.9,2042.83 4202.68,2042.83 4157,2088.5 4157,2117.5 4177.5,2138 4263.36,2138 4273.36,2148 4314.78,2148 4336.78,2170 4411,2170 4635,2394 4635,2458 4645,2468 4645,2476 4659,2490 4659,2491.3 4664,2496.3 4664,2515.35 4650.53,2528.83 4563.83,2528.83 4542,2507 v1(4542,2455)
  L5_SIG w6: v1(4114,2386) 4152,2348 4152,2093.5 4177.5,2068 4218.47,2068 4235.47,2051 4309,2051 4586,2328 4586,2457.38 4575.38,2468 4555,2468 v1(4542,2455)
  L6_HS2 w6: v1(3940,2432) 4068,2432 v1(4114,2386)
  L8_BOTTOM w6: v1(3764,2465) 3797.62,2465 3821.23,2441.38 3821.23,2433.38 3840.62,2414 3862.16,2414 3867.14,2409.02 3878.91,2409.02 3886.53,2416.63 3886.53,2427.4 3868.06,2445.87 3845.51,2445.87 3842,2449.38 3842,2461.49 3845.51,2465 3899.19,2465 3923.19,2441 3931,2441 v1(3940,2432)
PI4: CN3.17 M1.F14 U1A.A4 | length 8335
  L1_TOP w6: v1(3454,3034) 3467.07,3020.93 3467.07,3015.41 3479.54,3002.95 U1A.A4@3479.54,2985.98 ; v1(3468,1725.99) CN3.17@3468,1808.99 ; v1(5957,2815) 5957,2624.98 M1.F14@5972.97,2609.01
  L3_HS1 w6: v1(3934,1363) 4137.72,1363 4218.19,1443.48 4218.19,1509.19 4325,1616 4358.47,1616 4428.47,1686 4460.72,1686 4492.72,1718 4525.38,1718 4557.38,1750 5902.5,1750 5922.5,1770 6045.77,1770 6296.17,2020.4 6296.17,2054.51 6052,2298.68 6052,2720 v1(5957,2815)
  L5_SIG w6: v1(3260,2117) 3345,2202 3562.38,2202 3592.38,2172 3704.38,2172 3727,2194.62 3727,2319.49 3730.51,2323 3778.47,2323 3799.47,2344 3818.53,2344 3832.51,2330.01 3858.69,2330.01 3867.68,2339 3893.86,2339 3914.86,2360 3917.53,2360 3917.83,2360.31 3919.69,2360.31 3934,2374.62 3934,2419.62 3927,2426.62 3927,2488.38 3898.88,2516.5 3895.12,2516.5 3867,2544.62 3867,2630.49 3863.49,2634 3811.67,2634 3793,2615.33 3793,2600.63 3787.37,2595 3755.62,2595 3744.62,2606 3741.38,2606 3740.38,2607 3705.62,2607 3698,2599.38 3698,2580.81 3695,2577.81 3695,2572.55 3673.19,2550.74 3673.19,2548.81 3651.38,2527 3547.53,2527 3537.53,2517 3434.05,2517 3381.5,2569.55 3381.5,2891.5 v1(3399.51,2909.51)
  L8_BOTTOM w6: v1(3260,2117) 3261.14,2117 3390.14,1988 3476.43,1988 3506.43,2018 3699.38,2018 3936,1781.38 3936,1770.62 3934,1768.62 3934,1657.38 3944,1647.38 3944,1476.62 3934,1466.62 v1(3934,1363) 3471.51,1363 3468,1366.51 v1(3468,1725.99) ; v1(3399.51,2909.51) 3399.51,3008.51 3425,3034 v1(3454,3034)
PI5: CN3.15 M1.F2 U1A.A3 | length 8241.7
  L1_TOP w6: U1A.A3@3448.04,2985.98 3444.54,2989.47 3444.54,2997.57 3359.54,3082.57 3359.54,3087.54 v1(3374,3102) 3374,3118.06 3378,3122.06 3378,3136.49 3455,3213.49 v1(3455,3214) ; v1(3518,1725.99) CN3.15@3518,1808.99 ; v1(5508,2992) 5467,2992 5339,2864 5339,2630 5371,2598 v1(5420,2598) 5421.15,2599.15 5421.15,2612.15 5427,2618 5546.48,2618 5552.48,2624 5582.02,2624 5593.59,2612.43 5593.59,2611.21 5595.02,2609.78 M1.F2@5595.02,2609.01
  L3_HS1 w6: v1(3455,3214) 3456.15,3215.15 3456.15,3219.65 3474.5,3238 3486.91,3238 3495.91,3247 3520.49,3247 3568,3199.49 3568,3197.62 3575.62,3190 3605.38,3190 3618.38,3203 4815.95,3203 4909,3109.95 4909,2978.82 4899,2968.82 4899,2842.3 4911.3,2830 4928.7,2830 4951,2852.3 4951,3108.95 5030.05,3188 5499,3188 5520.51,3209.51 5525.49,3209.51 5529,3206 5529,3179.6 5537.76,3170.85 5537.76,3160.08 5494,3116.32 5494,3006 v1(5508,2992)
  L8_BOTTOM w6: v1(3374,3102) 3372.85,3103.15 3372.85,3114.18 3372,3115.03 3372,3120 3377,3125 3475.77,3125 3495.29,3105.48 3495.29,3103.32 3514.82,3083.8 3525.58,3083.8 3533.2,3091.42 3533.2,3102.18 3515,3120.38 3515,3155.38 3505.38,3165 3494.62,3165 3474.75,3145.13 3353.29,3145.13 3290.16,3082 3276.62,3082 3269.62,3075 3255.47,3075 3242,3061.53 3238.72,3061.53 3181,3003.81 3181,2946.53 3178,2943.53 3178,2849 3181,2846 3181,2839.47 3205.47,2815 3212,2815 3235,2792 3235,2774.12 3234,2773.12 3234,2747.38 3221,2734.38 3209,2734.38 3201.38,2742 3190.62,2742 3183,2734.38 3183,2692 3245,2630 3245,2482.59 3220,2457.59 3220,2271.13 3248.13,2243 3283.33,2243 3287.33,2247 3314.67,2247 3328.67,2233 3439.16,2233 3442.16,2236 3526.65,2236 3535.65,2245 3597.57,2245 3605.81,2236.76 3709.83,2236.76 3760.59,2186 3812.86,2186 3856.86,2230 3922.95,2230 3930.61,2222.34 3973.81,2222.34 3989.47,2238 4005.21,2238 4007.62,2238 4017.62,2248 4028.38,2248 4036,2240.38 4036,2229.62 4022,2204.38 4018,2200.38 4018,2105.86 3987,2074.86 3987,2064.51 3980.49,2058 3689.57,2058 3603,2144.57 3603,2161.38 3569.38,2195 3558.62,2195 3549.62,2186 3533.62,2186 3526,2178.38 3526,2167.62 3559.27,2134.35 3559.27,2129.38 3497.89,2068 3378.7,2068 3311.7,2135 3249.51,2135 3246,2131.49 3246,2076.38 3518,1804.38 v1(3518,1725.99)